# Altium PCB fotolitoTop.PcbDoc (part 4 of 4)
Units mil, origin at the board's own origin, x right, y up, seen from the top; angles counter-clockwise.
Board outline 7874.02 x 11220.47 mil, 2 copper layers (Top Layer, Bottom Layer); 110 components, 0 nets, 500 pads, 136 vias.
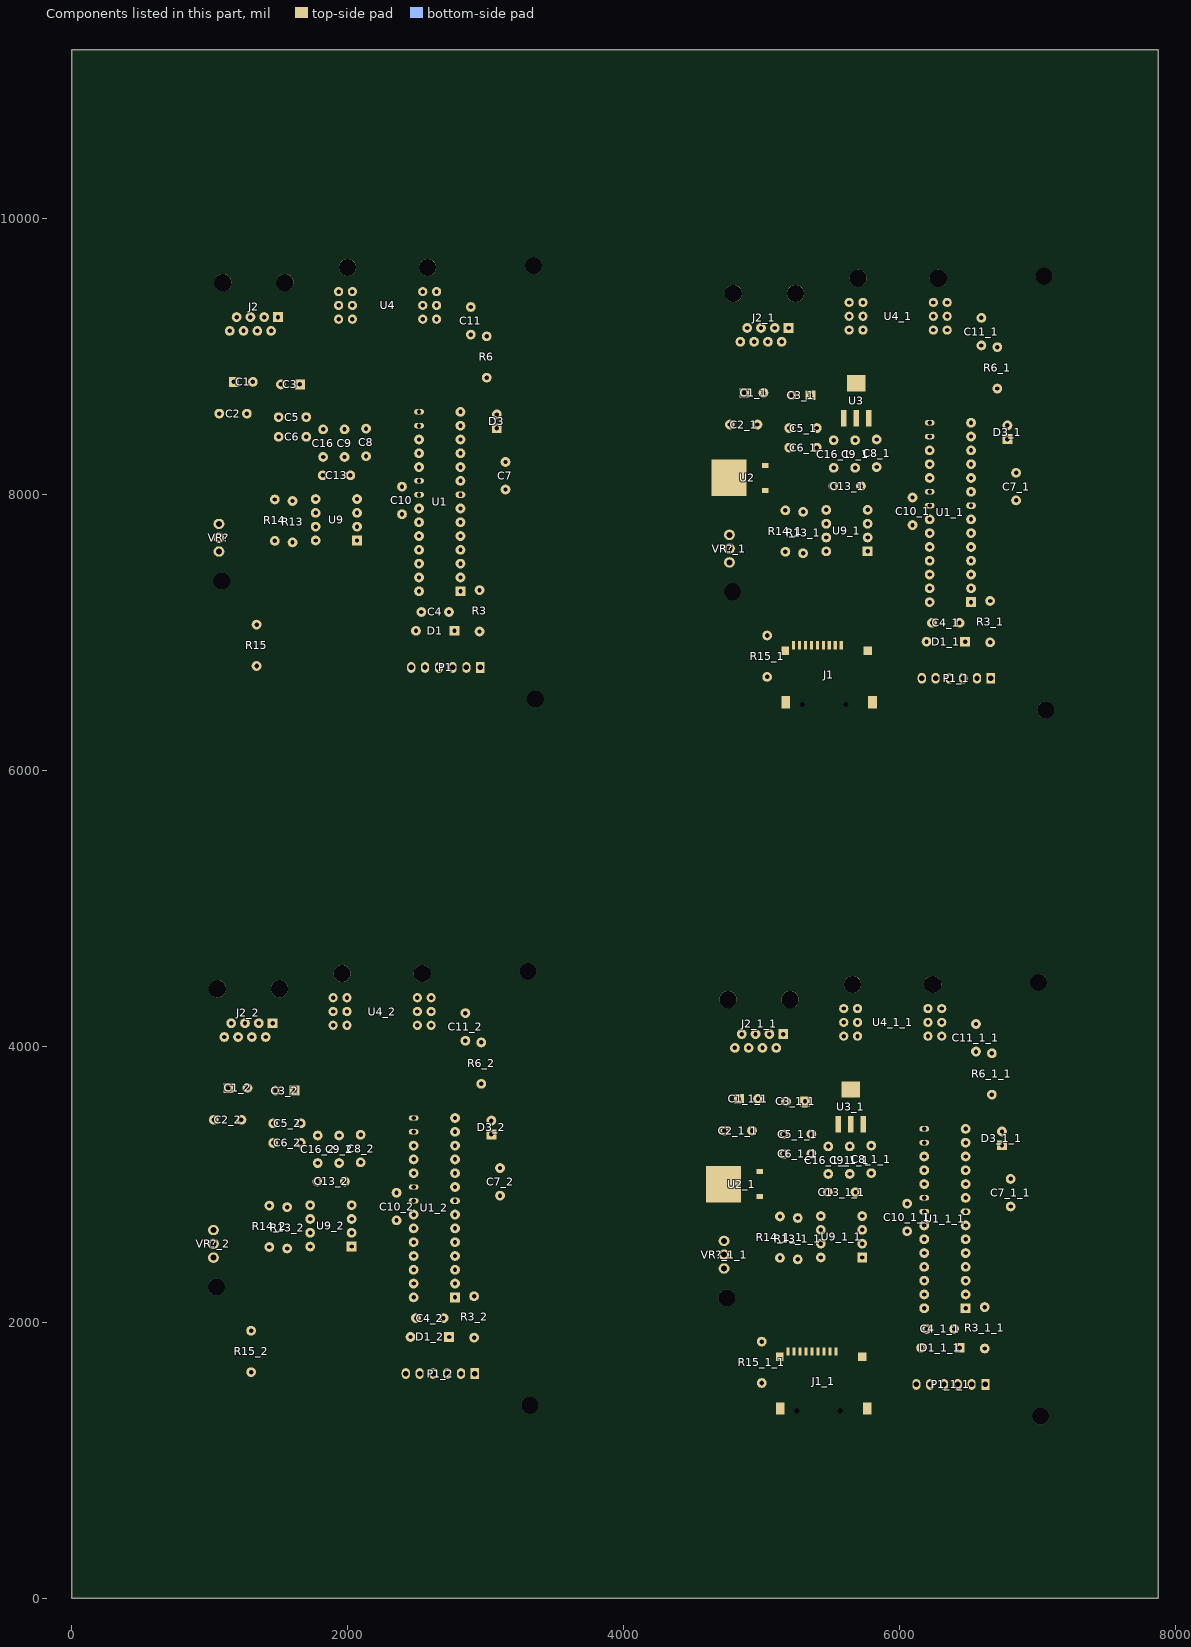
[diagram p4: the components of this part, seen from the top]

## Via types
v1: diameter 70.87, hole 27.56, Top Layer to Bottom Layer, 136 vias

## Nets (pads, with @x,y where several pads share a name; then routed paths per layer and width w, separated by ;. In a path a pad name is that pad's centre, name@x,y a point inside that pad or via, vN(x,y) a via of type N, cw(c..) or ccw(c..) an arc to the next point about the centre after c; other vN are vias at no path point) (continued)
copper on no net: (continued)
  Top Layer w23.62: v1(6316.35,2374.36) 6316.35,2799.44 ; v1(6355.72,7492.47) 6355.72,7917.55
  Top Layer w27.56: 4722.83,3000.4 4722.83,2991.84 5260.14,2454.53 5344.34,2538.72 5344.34,3205.01 5359.32,3219.99 ; 4728.83,3387.47 4728.83,3357.79 ; 4762.2,8118.51 4762.2,8109.95 5299.51,7572.64 5383.71,7656.83 5383.71,8323.12 5398.69,8338.1 ; 4768.2,8505.58 4768.2,8475.9 ; v1@4914.32,2412.7 4914.32,2657.08 4804.36,2767.04 4640.06,2767.04 4559.03,2848.07 4559.03,3187.99 4728.83,3357.79 ; 4928.83,3387.47 4944.58,3371.72 5149.74,3371.72 5159.32,3362.14 ; v1@4953.69,7530.81 4953.69,7775.19 4843.73,7885.15 4679.43,7885.15 4598.4,7966.18 4598.4,8306.1 4768.2,8475.9 ; 4968.2,8505.58 4983.95,8489.83 5189.11,8489.83 5198.69,8480.26 ; 4984.83,2910.4 5050.41,2975.98 5155.43,2975.98 ; 4984.83,3090.4 4728.83,3346.4 4728.83,3357.79 ; 4999.32,1558.48 5067.59,1626.75 5067.59,1816 5097.45,1845.85 5144.06,1845.85 5190.43,1799.48 5190.43,1787.55 ; 4999.32,1858.48 4999.32,2065.64 5189.78,2256.1 5398.73,2256.1 5406.97,2264.34 ; 5024.2,8028.51 5089.78,8094.09 5194.8,8094.09 ; 5024.2,8208.51 4768.2,8464.51 4768.2,8475.9 ; 5038.69,6676.59 5106.96,6744.86 5106.96,6934.11 5136.82,6963.96 5183.43,6963.96 5229.8,6917.59 5229.8,6905.66 ; 5038.69,6976.59 5038.69,7183.75 5229.15,7374.21 5438.1,7374.21 5446.34,7382.45 ; 5131.38,1748.18 5133.34,1746.21 ; 5131.63,2765.54 5131.63,2678.65 v1(5209.88,2600.4) ; 5133.34,1374.16 5133.34,1746.21 ; 5159.32,3219.99 5155.43,3216.11 5155.43,2975.98 ; 5170.75,6866.29 5172.71,6864.32 ; 5171,7883.65 5171,7796.76 v1(5249.25,7718.51) ; 5172.71,6492.27 5172.71,6864.32 ; v1@5197.84,2004.52 5363.66,1838.7 5363.66,1787.55 ; 5198.69,8338.1 5194.8,8334.22 5194.8,8094.09 ; v1(5204.87,2115.92) v1@5204.87,2123.18 ; v1@5237.21,7122.63 5403.03,6956.81 5403.03,6905.66 ; v1(5244.24,7234.03) v1@5244.24,7241.29 ; v1(5268.77,2862.64) 5155.43,2975.98 ; 5277.04,1787.55 5277.04,1828.49 5132.32,1973.22 5126.75,1978.79 5126.75,2100.4 5149.53,2123.18 v1@5204.87,2123.18 ; v1(5308.14,7980.75) 5194.8,8094.09 ; 5316.41,6905.66 5316.41,6946.6 5171.69,7091.33 5166.12,7096.9 5166.12,7218.51 5188.9,7241.29 v1@5244.24,7241.29 ; 5320.35,1787.55 5320.35,1727.68 ; 5359.32,3362.14 5359.32,3444.3 5471.18,3556.16 5681.67,3556.16 5727.55,3510.29 5727.55,3441.84 5735.37,3434.02 ; 5359.72,6905.66 5359.72,6845.79 ; 5398.69,8480.26 5398.69,8562.41 5510.55,8674.27 5721.04,8674.27 5766.92,8628.4 5766.92,8559.95 5774.74,8552.13 ; 5406.97,1787.55 5406.97,2115.92 ; 5406.97,2118.95 5406.97,2264.34 ; 5446.34,6905.66 5446.34,7234.03 ; 5446.34,7237.06 5446.34,7382.45 ; 5450.27,1787.55 5450.27,2092.06 v1(5529.44,2171.23) ; 5481.69,2943.63 5481.69,3073.82 ; v1@5481.69,4172.39 5593.82,4172.39 ; 5489.64,6905.66 5489.64,7210.17 v1(5568.81,7289.34) ; 5493.58,1787.55 5494.45,1788.42 5494.45,1915.5 5602.07,2023.12 6667.81,2023.12 6697.82,2053.13 6697.82,2325.44 v1@6625.65,2397.61 ; v1@5496.48,4366.59 5552.47,4310.59 5555.61,4310.59 5593.82,4272.39 ; 5521.06,8061.74 5521.06,8191.93 ; v1@5521.06,9290.5 5633.19,9290.5 ; 5532.95,6905.66 5533.82,6906.53 5533.82,7033.61 5641.44,7141.23 6707.18,7141.23 6737.19,7171.24 6737.19,7443.55 v1@6665.02,7515.72 ; v1@5535.85,9484.7 5591.84,9428.71 5594.98,9428.71 5633.19,9390.5 ; 5554.26,3434.02 5554.26,3144.22 5483.86,3073.82 5637.18,3073.82 5787.7,3073.82 5793.08,3079.2 5803.51,3079.2 ; 5593.63,8552.13 5593.63,8262.33 5523.23,8191.93 5676.55,8191.93 5827.07,8191.93 5832.45,8197.31 5842.88,8197.31 ; 5593.82,4072.39 5593.82,3886.83 5639.17,3841.49 5830.64,3841.49 6179.31,3492.82 6535.64,3492.82 6643.24,3385.21 6643.24,3079.08 6638.3,3074.14 6638.3,3073.14 6592.79,3027.63 v1@6587.93,3027.63 ; v1@5628.23,2521.5 5614.29,2507.56 5614.29,2265.72 5664.16,2215.85 6058.36,2215.85 6108.51,2266 6108.51,2465.29 v1(6047.61,2526.19) ; 5633.19,9190.5 5633.19,9004.94 5678.54,8959.6 5870.01,8959.6 6218.68,8610.93 6575.01,8610.93 6682.61,8503.32 6682.61,8197.19 6677.67,8192.25 6677.67,8191.25 6632.16,8145.74 v1@6627.3,8145.74 ; 5644.82,3434.02 5644.82,3281.46 5637.18,3273.82 5787.7,3273.82 5793.08,3279.2 ; 5644.82,3685.99 5773.13,3685.99 ; v1@5667.6,7639.61 5653.66,7625.67 5653.66,7383.83 5703.53,7333.96 6097.73,7333.96 6147.88,7384.11 6147.88,7583.4 v1(6086.98,7644.3) ; 5684.19,8552.13 5684.19,8399.57 5676.55,8391.93 5827.07,8391.93 5832.45,8397.31 ; 5684.19,8804.1 5812.5,8804.1 ; 5693.82,4272.39 5709.78,4272.39 5980.44,4001.73 5980.44,3777.63 6211.14,3546.93 6839.85,3546.93 6933.39,3453.38 6933.39,2780.29 6830,2676.89 6605.83,2676.89 6562.66,2633.72 6562.66,2585.89 6562.79,2586.03 6562.79,2542.94 6605.33,2500.4 v1(6625.65,2500.4) ; 5733.19,9390.5 5749.15,9390.5 6019.81,9119.84 6019.81,8895.74 6250.51,8665.04 6879.22,8665.04 6972.76,8571.49 6972.76,7898.4 6869.37,7795 6645.2,7795 6602.03,7751.83 6602.03,7704 6602.16,7704.14 6602.16,7661.05 6644.7,7618.51 v1(6665.02,7618.51) ; 5763.26,1374.16 5763.26,1712.75 5727.83,1748.18 ; 5802.63,6492.27 5802.63,6830.86 5767.2,6866.29 ; v1(5819.87,2455.92) 5823.15,2455.92 5980.5,2298.57 v1(6040.25,2298.57) ; v1(5859.24,7574.03) 5862.52,7574.03 6019.87,7416.68 v1(6079.62,7416.68) ; v1(5892.17,3346.74) 5892.17,3502.69 v1(5914.27,3524.79) ; v1(5931.54,8464.85) 5931.54,8620.8 v1(5953.64,8642.9) ; v1(5988.02,3342.89) 5980.44,3335.31 5980.44,2444.19 6011.93,2412.7 v1(6040.25,2412.7) ; v1(6027.39,8461) 6019.81,8453.42 6019.81,7562.3 6051.3,7530.81 v1(6079.62,7530.81) ; v1@6034.1,3538.27 6034.1,3540.11 5888.22,3685.99 5773.13,3685.99 ; 6053.43,2853.16 6053.43,2858.77 ; v1@6073.47,8656.38 6073.47,8658.22 5927.59,8804.1 5812.5,8804.1 ; v1(6080.78,3337.75) v1@6093.43,3350.4 ; 6092.8,7971.27 6092.8,7976.88 ; v1(6120.15,8455.86) v1@6132.8,8468.51 ; v1@6129.94,3895.83 6129.94,3842.38 6170.49,3801.83 6281.7,3801.83 6316.35,3836.49 6316.35,4060.09 6304.05,4072.39 ; v1@6169.31,9013.94 6169.31,8960.49 6209.86,8919.94 6321.07,8919.94 6355.72,8954.6 6355.72,9178.2 6343.42,9190.5 ; 6204.05,4072.39 6204.05,3932.03 6229.53,3906.56 6219.77,3896.8 v1(6239.29,3896.8) ; 6204.05,4172.39 6131.85,4172.39 6047.61,4088.15 6047.61,3814.66 v1(6219.77,3642.5) ; 6204.05,4272.39 6204.05,4322.89 6233.99,4352.82 6335.63,4352.82 6471.16,4217.29 6471.16,3754.61 6364.88,3648.33 v1(6364.88,3637.9) ; 6243.42,9190.5 6243.42,9050.14 6268.9,9024.67 6259.14,9014.91 v1(6278.66,9014.91) ; 6243.42,9290.5 6171.22,9290.5 6086.98,9206.26 6086.98,8932.77 v1(6259.14,8760.61) ; 6243.42,9390.5 6243.42,9441 6273.36,9470.93 6375,9470.93 6510.53,9335.4 6510.53,8872.72 6404.25,8766.44 v1(6404.25,8756.01) ; 6262.64,2853.16 6316.35,2799.44 ; 6302.01,7971.27 6355.72,7917.55 ; v1@6303.89,1433.26 6652.2,1433.26 6752.03,1533.09 6752.03,2504.67 6702.62,2554.09 6703.97,2554.09 v1@6643.5,2614.55 ; 6304.05,4172.39 6304.05,4072.39 ; 6304.05,4272.39 6304.05,4266.32 v1@6400.23,4170.15 ; 6310.46,3350.4 6370.81,3290.05 6370.81,3114.98 v1(6384.87,3100.92) ; v1@6343.26,6551.37 6691.57,6551.37 6791.4,6651.2 6791.4,7622.78 6741.99,7672.2 6743.34,7672.2 v1@6682.87,7732.66 ; 6343.42,9290.5 6343.42,9190.5 ; 6343.42,9390.5 6343.42,9384.43 v1@6439.6,9288.26 ; 6349.83,8468.51 6410.18,8408.16 6410.18,8233.09 v1(6424.24,8219.03) ; 6400.1,1963.57 6286.79,1850.26 6286.79,1672.91 v1(6293.9,1665.8) 6211.52,1748.18 5727.83,1748.18 ; v1@6405.27,4072.39 6304.05,4072.39 ; 6439.47,7081.68 6326.16,6968.37 6326.16,6791.02 v1(6333.27,6783.91) 6250.89,6866.29 5767.2,6866.29 ; v1@6444.64,9190.5 6343.42,9190.5 ; v1(6697.82,3023.23) 6702.93,3023.23 6712.66,3032.97 v1(6712.66,2757.65) ; v1(6737.19,8141.34) 6742.3,8141.34 6752.03,8151.08 v1(6752.03,7875.76) ; 5133.34,1746.21 5133.34,1711.82 5192.99,1652.17 5287.83,1652.17 5320.35,1684.7 5320.35,1727.68 ; 5172.71,6864.32 5172.71,6829.93 5232.36,6770.28 5327.2,6770.28 5359.72,6802.81 5359.72,6845.79 ; v1@5204.87,2123.18 5198.39,2129.67 5204.15,2123.91 v1@5204.87,2123.18 ; v1@5244.24,7241.29 5243.52,7242.02 5237.76,7247.78 v1@5244.24,7241.29 ; 5320.35,1727.68 5395.85,1652.17 5631.83,1652.17 5727.83,1748.18 ; 5359.72,6845.79 5435.22,6770.28 5671.2,6770.28 5767.2,6866.29 ; 5406.97,2264.34 5558.46,2415.83 5558.46,2792.24 5678.96,2912.74 5678.96,2940.9 5844.04,2940.9 5881.11,2977.97 5881.11,3254.44 5856.36,3279.2 5793.08,3279.2 ; 5446.34,7382.45 5597.83,7533.94 5597.83,7910.35 5718.33,8030.85 5718.33,8059.01 5883.41,8059.01 5920.48,8096.08 5920.48,8372.55 5895.73,8397.31 5832.45,8397.31 ; 5773.13,3685.99 5835.03,3624.09 5835.03,3378.69 5793.08,3336.73 5793.08,3279.2 ; 5812.5,8804.1 5874.4,8742.2 5874.4,8496.8 5832.45,8454.84 5832.45,8397.31
  Bottom Layer w23.62: 2346.82,2730.05 2346.82,2824.2 2351.76,2829.14 2351.76,2845.91 2476.38,2970.52 ; 2386.19,7848.16 2386.19,7942.31 2391.13,7947.25 2391.13,7964.02 2515.75,8088.63 ; 2476.38,2579.14 2620.84,2723.61 2620.84,3677.57 2653.66,3710.39 2653.66,3716.64 v1(2664.09,3716.64) ; 2506.11,2779.14 2581.47,2854.51 2581.47,3658.75 v1(2518.98,3721.24) ; 2515.75,7697.25 2660.21,7841.72 2660.21,8795.68 2693.03,8828.5 2693.03,8834.75 v1(2703.46,8834.75) ; 2539.37,2925.25 2539.37,3534.43 ; 2545.48,7897.25 2620.84,7972.62 2620.84,8776.86 v1(2558.35,8839.35) ; 2578.74,8043.36 2578.74,8652.54
  Bottom Layer w27.56: 951.33,3222.95 1069.52,3104.76 1328.66,3104.76 1387.68,3163.78 1387.68,4053.5 1459.09,4124.91 1459.09,4174.91 ; 953.04,3224.66 953.04,3391.21 1028.04,3466.21 1028.04,3591.01 1133.79,3696.76 ; 990.7,8341.06 1108.89,8222.87 1368.03,8222.87 1427.05,8281.89 1427.05,9171.61 1498.46,9243.02 1498.46,9293.02 ; 992.41,8342.77 992.41,8509.32 1067.41,8584.32 1067.41,8709.12 1173.16,8814.88 ; 1025.49,2467.16 1185.89,2467.16 v1(1208.14,2489.41) ; 1025.49,2567.16 1407.96,2567.16 1430.84,2544.28 1515.47,2459.65 1760.87,2459.65 1806.23,2505.01 1806.23,2791.45 1750.3,2847.38 1726.75,2847.38 ; 1025.49,2667.16 1425.46,2667.16 1559.35,2533.27 1712.64,2533.27 1726.75,2547.38 ; 1064.86,7585.27 1225.26,7585.27 v1(1247.51,7607.52) ; 1064.86,7685.27 1447.33,7685.27 1470.21,7662.39 1554.84,7577.76 1800.24,7577.76 1845.6,7623.12 1845.6,7909.56 1789.67,7965.49 1766.12,7965.49 ; 1064.86,7785.27 1464.83,7785.27 1598.72,7651.38 1752.01,7651.38 1766.12,7665.49 ; 1159.09,4174.91 1159.09,4263.55 1208.04,4312.49 1531.25,4312.49 1619.56,4224.17 1619.56,3802.05 1926.5,3495.11 2213.76,3495.11 v1(2287.24,3421.63) ; 1198.46,9293.02 1198.46,9381.66 1247.41,9430.6 1570.62,9430.6 1658.93,9342.28 1658.93,8920.16 1965.87,8613.22 2253.13,8613.22 v1(2326.61,8539.74) ; 1209.09,4074.91 1209.09,3982.85 900.32,3674.08 900.32,2869.12 1006.17,2763.27 1514.61,2763.27 1559.35,2808.01 1559.35,2833.27 1645.24,2747.38 1726.75,2747.38 ; 1228.04,3466.21 1228.04,3653.22 1271.59,3696.76 1271.59,4036.42 1359.09,4123.92 1359.09,4174.91 ; 1248.46,9193.02 1248.46,9100.96 939.69,8792.19 939.69,7987.23 1045.54,7881.38 1553.98,7881.38 1598.72,7926.12 1598.72,7951.38 1684.61,7865.49 1766.12,7865.49 ; 1259.09,4174.91 1347.46,4263.28 1505.17,4263.28 1544.08,4224.37 1544.08,3058.35 1430.84,2945.11 1430.84,2844.28 ; 1267.41,8584.32 1267.41,8771.33 1310.96,8814.88 1310.96,9154.53 1398.46,9242.03 1398.46,9293.02 ; 1298.46,9293.02 1386.83,9381.39 1544.54,9381.39 1583.45,9342.48 1583.45,8176.46 1470.21,8063.22 1470.21,7962.39 ; 1298.54,1637.22 2187.32,1637.22 2408.1,1416.44 2988.53,1416.44 3178.23,1606.13 3178.23,2677.29 3043.12,2812.4 v1@3043.12,2833.27 ; 1298.54,1937.22 2382.49,1937.22 2439.44,1880.26 ; 1337.91,6755.33 2226.69,6755.33 2447.47,6534.55 3027.9,6534.55 3217.6,6724.24 3217.6,7795.4 3082.49,7930.51 v1@3082.49,7951.38 ; 1337.91,7055.33 2421.86,7055.33 2478.81,6998.37 ; 1458.53,3298.73 1458.53,3440.89 1458.53,3662.05 1474.81,3678.33 ; v1@1494.47,2187.42 v1@1513.21,2187.42 ; 1497.9,8416.84 1497.9,8559 1497.9,8780.16 1514.18,8796.44 ; v1(1504.09,2076.22) 1492.5,2076.22 1430.34,2138.38 1430.34,2278.33 1478.65,2326.63 2030.94,2326.63 2187.89,2483.58 2187.89,2554.23 2189.02,2555.36 2189.02,3083.65 2449.47,3344.1 2449.82,3344.1 2476.38,3370.66 2476.38,3379.14 ; v1@1504.09,2201.92 1543.18,2162.82 2130.83,2162.82 2275.71,2307.71 2275.71,2349.19 2274.5,2350.4 2274.5,2404.22 2275.71,2405.43 2275.71,2463.33 2274.5,2464.54 2274.5,2518.35 2275.71,2519.56 2275.71,3002.21 2452.64,3179.14 2476.38,3179.14 ; v1(1509.09,2679.14) 1601.33,2679.14 1633.08,2647.38 1726.75,2647.38 ; v1@1533.84,7305.53 v1@1552.59,7305.53 ; v1(1543.46,7194.34) 1531.87,7194.34 1469.71,7256.49 1469.71,7396.44 1518.02,7444.74 2070.31,7444.74 2227.26,7601.69 2227.26,7672.34 2228.39,7673.47 2228.39,8201.77 2488.84,8462.21 2489.19,8462.21 2515.75,8488.77 2515.75,8497.25 ; v1@1543.46,7320.03 1582.55,7280.94 2170.2,7280.94 2315.08,7425.82 2315.08,7467.3 2313.87,7468.51 2313.87,7522.33 2315.08,7523.54 2315.08,7581.44 2313.87,7582.65 2313.87,7636.46 2315.08,7637.67 2315.08,8120.32 2492.01,8297.25 2515.75,8297.25 ; v1(1548.46,7797.25) 1640.7,7797.25 1672.45,7765.49 1766.12,7765.49 ; v1@1559.89,2930.59 1643.55,2930.59 1726.75,2847.38 ; v1@1599.26,8048.7 1682.92,8048.7 1766.12,7965.49 ; 1612.61,3678.33 1658.53,3632.4 1658.53,3440.89 1658.53,3298.73 ; 1651.98,8796.44 1697.9,8750.51 1697.9,8559 1697.9,8416.84 ; 1778.18,3019.64 1726.75,2968.21 1726.75,2847.38 ; 1780.91,3352.56 1936.39,3352.56 ; v1(1792.79,4241.04) 1792.79,4102.93 1847.42,4048.3 2670.03,4048.3 2776.38,3941.95 2776.38,3479.14 ; v1(1792.79,4437.57) 1747.48,4437.57 1673.31,4363.4 1673.31,3908.39 2040.24,3541.45 2186.47,3541.45 2187.39,3540.53 2414.98,3540.53 2476.38,3479.14 ; 1817.55,8137.75 1766.12,8086.32 1766.12,7965.49 ; 1820.28,8470.67 1975.76,8470.67 ; v1(1832.16,9359.15) 1832.16,9221.04 1886.79,9166.41 2709.4,9166.41 2815.75,9060.06 2815.75,8597.25 ; v1(1832.16,9555.68) 1786.85,9555.68 1712.68,9481.51 1712.68,9026.5 2079.61,8659.56 2225.84,8659.56 2226.76,8658.64 2454.35,8658.64 2515.75,8597.25 ; v1@1834.06,2245.45 2086.16,2245.45 2231.19,2390.48 2231.19,2422.16 2232.4,2423.36 2232.4,2445.39 2231.19,2446.6 2231.19,2536.29 2232.4,2537.5 2232.4,3035.17 2476.38,3279.14 ; v1@1873.43,7363.56 2125.53,7363.56 2270.56,7508.59 2270.56,7540.27 2271.77,7541.47 2271.77,7563.5 2270.56,7564.71 2270.56,7654.4 2271.77,7655.61 2271.77,8153.28 2515.75,8397.25 ; v1(1929.52,2616.83) 1960.07,2647.38 2026.75,2647.38 2026.75,2747.38 ; v1(1968.89,7734.94) 1999.44,7765.49 2066.12,7765.49 2066.12,7865.49 ; 2026.75,2547.38 2109.64,2547.38 2119.09,2537.94 v1(2119.09,2534.66) ; 2026.75,2847.38 2145.72,2966.35 2145.72,3113.88 2379.37,3347.53 v1@2379.37,3412.47 ; 2066.12,7665.49 2149.01,7665.49 2158.46,7656.05 v1(2158.46,7652.77) ; 2066.12,7965.49 2185.09,8084.46 2185.09,8231.99 2418.74,8465.64 v1@2418.74,8530.58 ; 2092.29,3157.94 2102.72,3157.94 2192.02,3247.24 2191.38,3247.87 v1(2191.38,3425.48) ; 2131.66,8276.05 2142.09,8276.05 2231.39,8365.35 2230.75,8365.98 v1(2230.75,8543.59) ; v1(2213.48,3603.53) 1716.62,4100.39 1716.62,4261.01 1830.04,4374.44 1830.04,4377.22 1866.94,4414.12 1869.72,4414.12 1876.27,4420.67 2791.77,4420.67 ; v1(2252.85,8721.64) 1755.99,9218.5 1755.99,9379.12 1869.41,9492.55 1869.41,9495.33 1906.31,9532.23 1909.09,9532.23 1915.64,9538.78 2831.14,9538.78 ; v1(2325.94,3607.79) 2325.94,3864.2 v1(2427.31,3965.57) ; v1(2339.46,2491.44) 2351.76,2479.14 2476.38,2479.14 ; v1(2346.82,2604.93) 2421.04,2679.14 2476.38,2679.14 ; 2346.82,2930.05 2346.82,2949.59 2476.38,3079.14 ; v1(2365.31,8725.9) 2365.31,8982.31 v1(2466.68,9083.68) ; v1@2367.6,2379.14 2476.38,2379.14 ; v1(2378.83,7609.55) 2391.13,7597.25 2515.75,7597.25 ; v1(2386.19,7723.04) 2460.41,7797.25 2515.75,7797.25 ; 2386.19,8048.16 2386.19,8067.7 2515.75,8197.25 ; v1@2406.97,7497.25 2515.75,7497.25 ; 2476.38,2179.14 2499.31,2156.21 2499.31,2042.31 2453.8,1996.8 2453.8,1892.4 2554.11,1892.4 2819.6,1626.91 ; 2476.38,2779.14 2506.11,2779.14 ; 2476.38,2879.14 2493.26,2879.14 2539.37,2925.25 ; 2476.38,2970.52 2476.38,2979.14 ; 2515.75,7297.25 2538.68,7274.32 2538.68,7160.42 2493.17,7114.91 2493.17,7010.51 2593.48,7010.51 2858.97,6745.02 ; 2515.75,7897.25 2545.48,7897.25 ; 2515.75,7997.25 2532.63,7997.25 2578.74,8043.36 ; 2515.75,8088.63 2515.75,8097.25 ; 2519.6,1626.91 2519.6,1604.4 2603.1,1520.9 v1@2603.1,1512 ; v1@2525.27,3988.77 2525.27,3962.1 2436.53,3873.36 2436.53,3637.27 2539.37,3534.43 ; 2558.97,6745.02 2558.97,6722.51 2642.47,6639.01 v1@2642.47,6630.11 ; v1@2564.64,9106.89 2564.64,9080.21 2475.9,8991.47 2475.9,8755.38 2578.74,8652.54 ; v1(2593.11,1744.54) 2608.04,1744.54 2719.6,1632.97 2719.6,1626.91 ; 2619.6,1626.91 2720.49,1526.02 2979.1,1526.02 3047.98,1594.91 3047.98,2718.24 2997.03,2769.19 2786.32,2769.19 2776.38,2779.14 ; v1(2632.48,6862.65) 2647.41,6862.65 2758.97,6751.08 2758.97,6745.02 ; 2658.97,6745.02 2759.86,6644.13 3018.47,6644.13 3087.35,6713.02 3087.35,7836.35 3036.4,7887.3 2825.69,7887.3 2815.75,7897.25 ; 2681.64,2073.87 2476.38,2279.14 2535.73,2279.14 2615.57,2358.98 v1(2615.57,2453.1) 2680.99,2518.52 2680.99,2819.21 2740.92,2879.14 2776.38,2879.14 2817.85,2920.62 3168.86,2920.62 3237.46,2989.21 3237.46,3974.98 2961.31,4251.13 2851.33,4251.13 ; v1(2684.09,3179.66) 2766.89,3179.66 2771.89,3174.66 2776.38,3179.14 ; 2698.16,2057.11 2691.34,2050.29 2699.31,2042.31 ; v1(2698.16,4157.29) 2733.42,4157.29 2846.06,4044.65 2846.06,3420.75 2804.45,3379.14 ; v1(2701.68,4251.13) 2851.33,4251.13 ; 2721.01,7191.98 2515.75,7397.25 2575.1,7397.25 2654.94,7477.09 v1(2654.94,7571.21) 2720.36,7636.63 2720.36,7937.32 2780.29,7997.25 2815.75,7997.25 2857.22,8038.73 3208.23,8038.73 3276.83,8107.32 3276.83,9093.09 3000.68,9369.24 2890.7,9369.24 ; v1(2723.46,8297.77) 2806.26,8297.77 2811.26,8292.77 2815.75,8297.25 ; 2733.33,1892.4 2909.74,1892.4 2914.72,1887.42 ; 2737.53,7175.22 2730.71,7168.4 2738.68,7160.42 ; v1(2737.53,9275.4) 2772.79,9275.4 2885.43,9162.76 2885.43,8538.86 2843.82,8497.25 ; v1(2741.05,9369.24) 2890.7,9369.24 ; 2772.7,7010.51 2949.11,7010.51 2954.09,7005.53 ; 2776.38,2179.14 2906.43,2179.14 2914.72,2187.42 2985.03,2117.11 2985.03,1692.33 2919.6,1626.91 ; 2776.38,2479.14 2915.43,2479.14 v1(2923.83,2470.74) ; 2776.38,2579.14 v1(2924.86,2579.14) ; 2776.38,2679.14 2776.89,2679.66 v1(2929.09,2679.66) ; 2776.38,2979.14 2783.4,2986.17 2798.69,2986.17 2821.92,3009.4 3121.6,3009.4 3188,3075.8 3188,3212.48 3040,3360.48 ; 2776.38,3079.14 2846.79,3079.14 v1@2861.86,3094.2 ; 2776.38,3279.14 2914.72,3279.14 2997.03,3196.83 v1(2997.03,3101.97) ; 2776.38,3379.14 2804.45,3379.14 ; 2789.74,4423.3 2849.31,4363.74 ; 2815.75,7297.25 2945.8,7297.25 2954.09,7305.53 3024.4,7235.22 3024.4,6810.44 2958.97,6745.02 ; 2815.75,7597.25 2954.8,7597.25 v1(2963.2,7588.85) ; 2815.75,7697.25 v1(2964.23,7697.25) ; 2815.75,7797.25 2816.26,7797.77 v1(2968.46,7797.77) ; 2815.75,8097.25 2822.77,8104.28 2838.06,8104.28 2861.29,8127.51 3160.97,8127.51 3227.37,8193.91 3227.37,8330.59 3079.37,8478.59 ; 2815.75,8197.25 2886.16,8197.25 v1@2901.23,8212.31 ; 2815.75,8397.25 2954.09,8397.25 3036.4,8314.94 v1(3036.4,8220.08) ; 2815.75,8497.25 2843.82,8497.25 ; 2829.11,9541.41 2888.68,9481.85 ; 2851.33,4239.38 2851.33,4251.13 ; 2851.33,4361.1 2851.33,4251.13 ; 2890.7,9357.49 2890.7,9369.24 ; 2890.7,9479.21 2890.7,9369.24 ; 2966.63,3727.11 2966.63,3540.62 3035.95,3471.3 ; 2966.63,4027.11 2966.63,4049.03 3065.02,4147.42 ; 3006,8845.22 3006,8658.73 3075.32,8589.41 ; 3006,9145.22 3006,9167.14 3104.39,9265.53 ; 3098.8,3126.79 3098.8,3180.46 2900.11,3379.14 2804.45,3379.14 ; 3138.17,8244.9 3138.17,8298.57 2939.48,8497.25 2843.82,8497.25
  other v1: 6294.96,1431.11 2594.17,1509.85 5204.87,1997.48 1504.09,2194.66 1828.66,2249.97 2339.46,2377.31 6624.62,2392 4908.92,2410.67 5630.31,2538.09 6629.87,2600.92 3011.88,2836.39 1567.99,2941.38 6584.68,3027.63 2883.89,3106.37 2380,3416.49 6026.73,3529.05 6128.1,3886.83 2538.5,3975.54 6398.95,4078.55 5493.58,4162.3 6402.47,4172.39 5493.58,4358.83 6334.33,6549.22 2633.54,6627.96 5244.24,7115.59 1543.46,7312.77 1868.03,7368.08 2378.83,7495.42 6663.99,7510.11 4948.29,7528.78 5669.68,7656.2 6669.24,7719.03 3051.25,7954.5 1607.36,8059.49 6624.05,8145.74 2923.26,8224.48 2419.37,8534.6 6066.1,8647.16 6167.47,9004.94 2577.87,9093.65 6438.32,9196.66 5532.95,9280.41 6441.84,9290.5 5532.95,9476.94

## Polygon pours and split planes (outlines as drawn)
no net on Bottom Layer "Bottom Layer" (solid, pour order 76): 908.85,2088.22 843.17,2153.89 840.98,2153.89 840.98,4561.9 843.17,4564.09 913.22,4634.14 928.55,4634.14 2053.74,4634.14 2058.12,4629.76 2062.5,4625.38 2062.5,4463.39 2430.26,4463.39 2434.64,4467.77 2436.83,4469.95 2436.83,4636.33 3371.58,4636.33 3378.14,4629.76 3402.22,4605.68 3410.98,4605.68 3410.98,1363.63 3404.41,1357.06 3382.52,1335.17 3382.52,1322.04 1267.86,1322.04 1265.67,1324.23 1237.21,1352.69 1235.02,1352.69 1235.02,2070.71 1219.7,2086.03 904.47,2086.03
no net on Bottom Layer "Bottom Layer" (solid, pour order 68): 948.22,7206.33 882.54,7272 880.35,7272 880.35,9680.01 882.54,9682.2 952.59,9752.25 967.92,9752.25 2093.11,9752.25 2097.49,9747.87 2101.87,9743.49 2101.87,9581.5 2469.64,9581.5 2474.01,9585.88 2476.2,9588.07 2476.2,9754.44 3410.95,9754.44 3417.51,9747.87 3441.59,9723.79 3450.35,9723.79 3450.35,6481.74 3443.78,6475.17 3421.89,6453.28 3421.89,6440.15 1307.23,6440.15 1305.04,6442.34 1276.58,6470.8 1274.39,6470.8 1274.39,7188.82 1259.07,7204.14 943.84,7204.14
no net on Top Layer "Top Layer" (solid, pour order 78): 4610.15,2007.29 4609.63,2007.29 4541.77,2075.15 4543.96,2077.34 4543.96,4485.35 4545.01,4485.35 4621.05,4561.39 4627.04,4555.4 5754.53,4555.4 5754.53,4397.38 5763.28,4388.62 5768.28,4383.62 6137.62,4383.62 6137.62,4540.79 6147.22,4550.39 6154.41,4557.59 7070.48,4557.59 7081.12,4557.59 7111.77,4526.94 7103.01,4518.18 7103.01,1271.86 7103.01,1262.08 7079.61,1238.68 7074.99,1243.3 4986.97,1243.3 4966.45,1243.3 4935.81,1273.95 4938,1276.14 4938,2009.48 4612.34,2009.48 4610.15,2007.29
no net on Top Layer "Top Layer" (solid, pour order 74): 4649.52,7125.4 4649,7125.4 4581.14,7193.26 4583.33,7195.45 4583.33,9603.46 4584.38,9603.46 4660.42,9679.5 4666.41,9673.51 5793.9,9673.51 5793.9,9515.49 5802.65,9506.73 5807.65,9501.73 6176.99,9501.73 6176.99,9658.9 6186.59,9668.5 6193.78,9675.7 7109.85,9675.7 7120.49,9675.7 7151.14,9645.05 7142.38,9636.29 7142.38,6389.97 7142.38,6380.19 7118.98,6356.79 7114.36,6361.41 5026.34,6361.41 5005.82,6361.41 4975.18,6392.06 4977.37,6394.25 4977.37,7127.59 4651.71,7127.59 4649.52,7125.4

## Keep-outs
Keep-Out Layer:
  rectangle: 748.03,1220.47 3503.94,4763.78
  rectangle: 4448.82,1141.73 7204.72,4685.04
  rectangle: 4488.19,6259.84 7244.09,9803.15
  rectangle: 787.4,6338.58 3543.31,9881.89

## Other copper
Top Layer:
  text "R-012" at 6917.62,9357.61 h118.11 r90
  text "Acelerografo V1.4" at 7097.54,8104.66 h145.67 r90
  text "R-012" at 6878.25,4239.5 h118.11 r90
  text "Acelerografo V1.4" at 7058.17,2986.55 h145.67 r90

## Silkscreen, mask and mechanical layers (free items; w line width, h text height)
Mechanical 7:
  lines w27.56: 823.26,2147.51 823.26,3013.28 823.26,4572.32 917.03,4652.18 2075.66,4652.18 2075.66,4475.66 2420.09,4475.66 2420.09,4652.18 3383.14,4652.18 3424.09,4611.23 3424.09,1350.6 3383.14,1309.66 1254.48,1309.66 1213.53,1350.6 1213.53,2069.5 901.27,2069.5 823.26,2147.51 ; 862.63,7265.62 940.64,7187.61 1252.9,7187.61 1252.9,6468.71 1293.85,6427.77 3422.51,6427.77 3463.46,6468.71 3463.46,9729.34 3422.51,9770.29 2459.46,9770.29 2459.46,9593.77 2115.03,9593.77 2115.03,9770.29 956.4,9770.29 862.63,9690.43 862.63,8131.39 862.63,7265.62 ; 1850.68,4100.14 1850.68,4402.11 2039.65,4402.11 2039.65,4100.14 1850.68,4100.14 ; 1890.05,9218.25 2079.02,9218.25 2079.02,9520.22 1890.05,9520.22 1890.05,9218.25 ; 2460.91,4100.14 2460.91,4402.11 2649.89,4402.11 2649.89,4100.14 2460.91,4100.14 ; 2500.28,9218.25 2689.26,9218.25 2689.26,9520.22 2500.28,9520.22 2500.28,9218.25 ; 4524.05,2068.77 4524.05,2934.54 4524.05,4493.58 4617.82,4573.44 5776.45,4573.44 5776.45,4396.92 6120.87,4396.92 6120.87,4573.44 7083.93,4573.44 7124.87,4532.49 7124.87,1271.86 7083.93,1230.92 4955.27,1230.92 4914.32,1271.86 4914.32,1990.76 4602.05,1990.76 4524.05,2068.77 ; 4563.42,7186.88 4641.42,7108.87 4953.69,7108.87 4953.69,6389.97 4994.64,6349.03 7123.3,6349.03 7164.24,6389.97 7164.24,9650.6 7123.3,9691.55 6160.24,9691.55 6160.24,9515.03 5815.82,9515.03 5815.82,9691.55 4657.19,9691.55 4563.42,9611.69 4563.42,8052.65 4563.42,7186.88 ; 5551.47,4021.4 5551.47,4323.37 5740.44,4323.37 5740.44,4021.4 5551.47,4021.4 ; 5590.84,9139.51 5779.81,9139.51 5779.81,9441.48 5590.84,9441.48 5590.84,9139.51 ; 6161.7,4021.4 6161.7,4323.37 6350.68,4323.37 6350.68,4021.4 6161.7,4021.4 ; 6201.07,9139.51 6390.05,9139.51 6390.05,9441.48 6201.07,9441.48 6201.07,9139.51
Mechanical 15:
  the board outline again, w10

## Text inside footprints (layer, text, board x,y; h text height)
U4: Top Overlay "ADXL 355Z" at 2406.88,9065.58 h31.5 r180; Top Overlay "ANALOG DEVICES" at 2469.56,9014.91 h31.5 r180; Top Overlay "STBY" at 2339.93,9621.44 h31.5 r180; Top Overlay "P2" at 2007.04,9209.24 h31.5 r180; Top Overlay "P1" at 2610.29,9209.24 h31.5 r180
U4_1: Top Overlay "ADXL 355Z" at 6107.67,8986.84 h31.5 r180; Top Overlay "ANALOG DEVICES" at 6170.35,8936.17 h31.5 r180; Top Overlay "STBY" at 6040.71,9542.7 h31.5 r180; Top Overlay "P2" at 5707.82,9130.5 h31.5 r180; Top Overlay "P1" at 6311.08,9130.5 h31.5 r180
U4_1_1: Top Overlay "ADXL 355Z" at 6068.3,3868.73 h31.5 r180; Top Overlay "ANALOG DEVICES" at 6130.98,3818.06 h31.5 r180; Top Overlay "STBY" at 6001.34,4424.59 h31.5 r180; Top Overlay "P2" at 5668.45,4012.39 h31.5 r180; Top Overlay "P1" at 6271.71,4012.39 h31.5 r180
U4_2: Top Overlay "ADXL 355Z" at 2367.51,3947.47 h31.5 r180; Top Overlay "ANALOG DEVICES" at 2430.19,3896.8 h31.5 r180; Top Overlay "STBY" at 2300.56,4503.33 h31.5 r180; Top Overlay "P2" at 1967.67,4091.13 h31.5 r180; Top Overlay "P1" at 2570.92,4091.13 h31.5 r180